# Altium PCB DB42.PcbDoc (part 2 of 8)
Units mil, origin at the board's own origin, x right, y up, seen from the top; angles counter-clockwise.
Board outline 3236.22 x 4456.69 mil, 8 copper layers (Top Layer, MidLayer1, MidLayer2, GND-Layer5, MidLayer3, VCC, MidLayer4, Bottom Layer), stack 62.194 mil thick; 214 components, 470 nets, 1802 pads, 1663 vias.
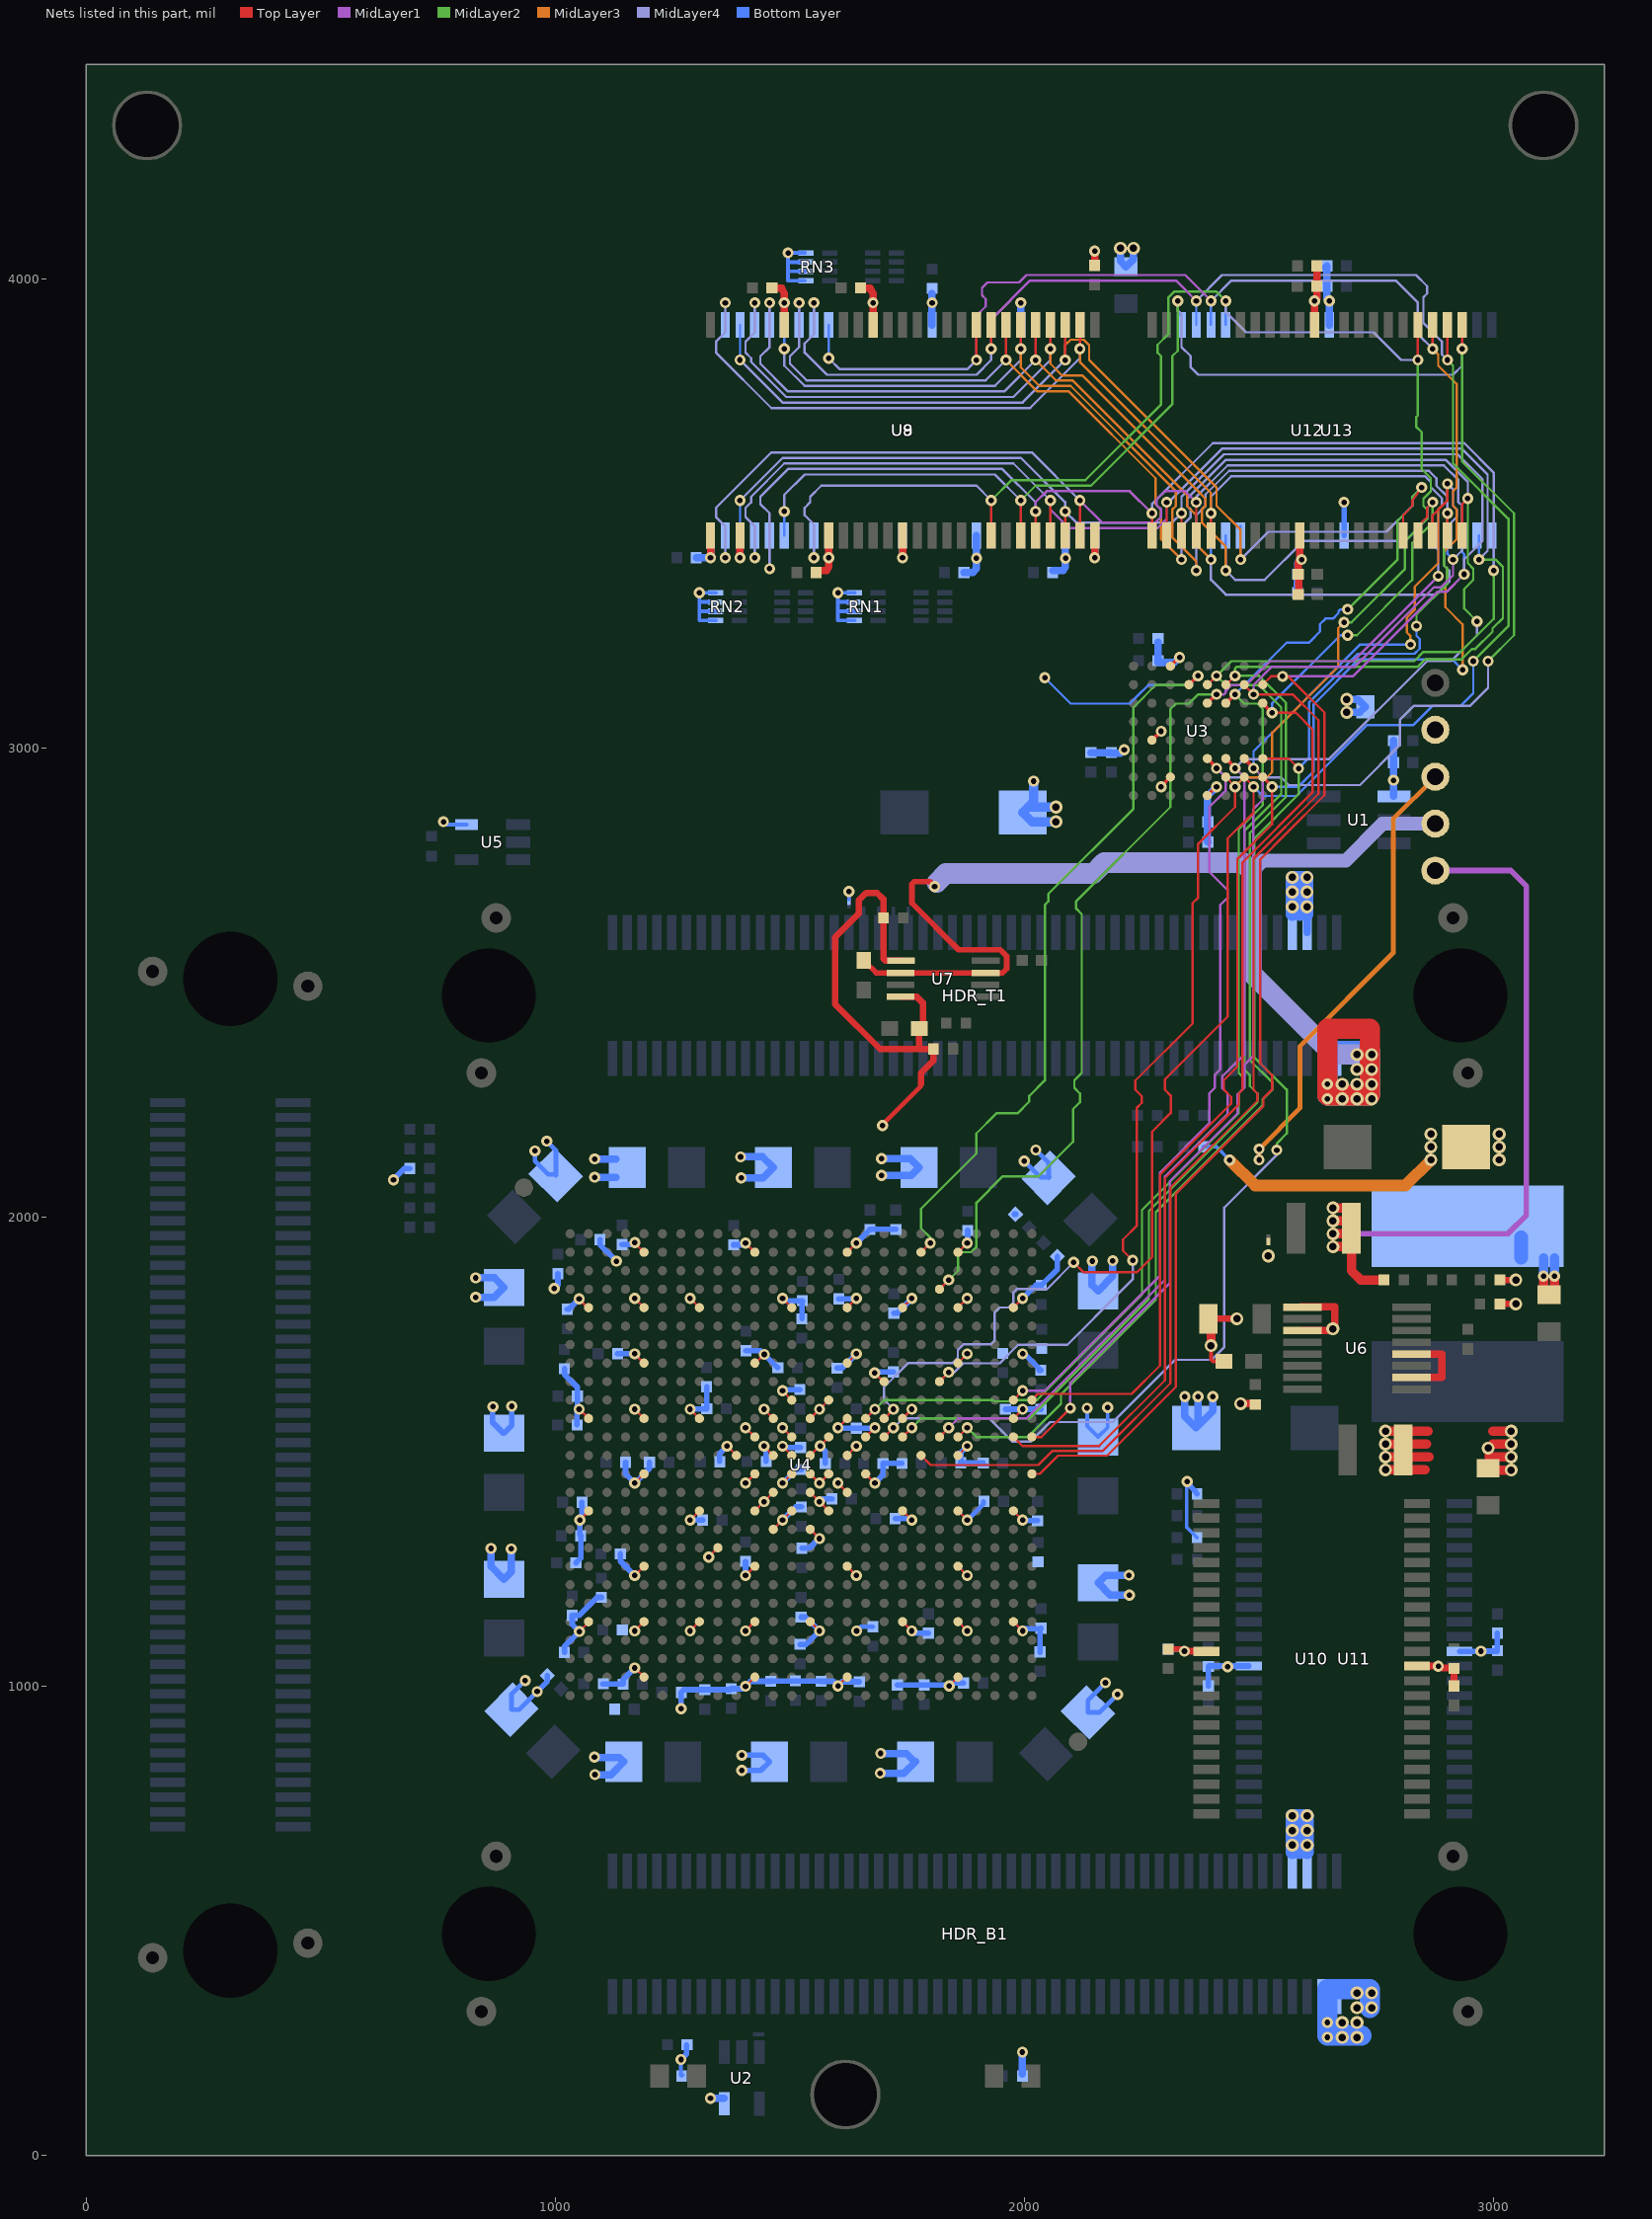
[diagram p8: the nets of this part, all layers, seen from the top]

## Part data
"Altium Logo Bot1" "Altium Logo Top1": library part D-000-0003, "Altium Logo for PCB"
C1 C11 C12 C13 C14 C23 C24 C25 C26 C27 C43 C44 C45 C46 C47 C48 C49 C50 C51 C52 C53 C54 C55 C56 C57 C58 C59 C60 C61 C62 C63 C64 C65 C66 C67 C68 C69 C101 C102 C103 C107 C121 C122 C123 C124 C129 C130 C133 C134 C137 C138 C139 C140: library part D-101-0080, "Capacitor, Ceramic, 0.1uF 10% 16V 0402 (1005) X7R"
C2 C15 C16 C17 C18 C28 C29 C30 C31 C32 C33 C34 C35 C36 C37 C38 C70 C71 C72 C73 C74 C75 C76 C77 C78 C79 C80 C81 C82 C83 C84 C85 C86 C87 C88 C89 C90 C91 C92 C93 C94 C95 C96 C97 C98 C104 C105 C106 C125 C126 C127 C128 C131 C132 C135 C136 C141 C142 C143 C144: library part D-101-0077, "Capacitor, Ceramic, 10nF 10% 16V 0402 (1005) X7R"
C3 C4 C5 C6 C7 C8 C9 C10 C19 C20 C21 C22 C39 C40 C41 C42: library part D-101-0007, "Capacitor, Tantalum, 10uF 10% 20V MCCT-B (3528)"
C99 C100 C112: library part D-101-0088, "Capacitor, Tantalum, 220uF 10% 10V MCCT-D (7343-31)"
C108 C109 C113 C115: library part D-101-0087, "Capacitor, Ceramic, 10uF 10% 10V 0805 (2012) X5R"
C110: library part D-101-0069, "Capacitor, Ceramic, 470pF 5% 50V 0402 (1005) COG"
C111 C118 C119: library part D-101-0095, "Capacitor, Ceramic, 2.2uF 10% 10V 0603 (1608) X5R"
C114 C116: library part D-101-0021, "Capacitor, Ceramic, 22uF -20%/+80% 10V 1210 (3225) Y5V"
C117: library part D-101-0027, "Capacitor, Ceramic, 1uF 10% 25V 1206 (3216) X7R"
C120: library part D-101-0105, "Capacitor, Ceramic, 0.033uF 10% 10V 0402 (1005) X7R"
HDR_B1 HDR_L1 HDR_T1: library part D-300-0025, "Connector, Molex Docking Station 100 Pin Male 54075"
L1: library part D-102-0004, "Inductor, 2.2uH, 15A, 4R2, SMD"
LED1: library part D-153-0004, "LED, Green 0805 (2012) KP-2012SGD"
LED2: library part D-153-0003, "LED, Red 0805 (2013) HSMH-C170"
MH1 MH2 MH3: library part D-001-0001, "Mounting Hole, M3 Screw, Plated, Square Pad"
NT1 NT2 NT3 NT4 NT5 NT6 NT7 NT8: library part D-002-0002, "Net-Tie, Surface Mount, 2 x 0.4mm x 0.2mm SMT Pads - For 0.2mm Track"
PCB1: library part D-810-0025, "DB42 Blank PCB - Daughter Board"
R1 R2 R9: library part D-100-0111, "Resistor, 270R 1% 0402 (1005)"
R3 R4 R5 R6 R7 R8 R14 R15 R16 R17: library part D-100-0131, "Resistor, 100R 1% 0402 (1005)"
R10 R11 R12 R13: library part D-100-0088, "Resistor, 4K7 1% 0402 (1005)"
R18 R23 R24 R25: library part D-100-0132, "Resistor, 100K 1% 0402 (1005)"
R19: library part D-100-0128, "Resistor, 10R 1% 0402 (1005)"
R20 R22: library part D-100-0105, "Resistor, 2K7 1% 0402 (1005)"
R21: library part D-100-0109, "Resistor, 27K 1% 0402 (1005)"
RN1 RN2 RN3 RN4 RN5 RN6: library part D-104-0001, "Resistor Network, Isolated, 4 x 100R, 5%, SMD 0402 x 4"
TP1 TP2 TP3 TP4 TP5: library part D-006-0000, "Test Point, PCB Mount with Silkscreen Box"
U1: library part D-263-0002, "Dual Addressable Switch Plus 1KB Memory"
U2 U5: library part D-205-0001, "SN74LVC1G04DBV, Single Inverter Gate, 1.65-V to 5.5-V"
U3: library part D-262-0001, "S29GL256N11FFIV10, 256 Megabit (16M x 16) 3.0V Page Mode Flash Memory"
U4: library part D-241-0013, "FPGA, Xilinx Spartan 3A-DSP-1800 FG676"
U6: library part D-204-0002, "MAX1831EEE, 3A, 1MHz, Low-Voltage, Step-Down Regulators with Synchronous Rectification and Internal Switches"
U7: library part D-204-0016, "MAX8860EUA18+, 1.8V Linear Regulator with adjustable Output, Low-noise, Low-dropout, 300mA, uMAX"
U8 U9: library part D-261-0000, "MT48LC16M16A2TG, 256 Mbit High-Speed CMOS SDRAM, 16Mb x 16Bit x 4 Banks, TSOP54"
U10 U11 U12 U13: library part D-260-0000, "K6R4016V1D-TC10T, 256K x 16-Bit SRAM, TSOP44"

## Via types
v1: diameter 23.62, hole 11.81, Top Layer to Bottom Layer, 1081 vias
v2: diameter 23.62, hole 11.81, Top Layer to Bottom Layer, tented both sides, 466 vias
v3: diameter 27.56, hole 15.75, Top Layer to Bottom Layer, 116 vias

## Nets (pads, with @x,y where several pads share a name; then routed paths per layer and width w, separated by ;. In a path a pad name is that pad's centre, name@x,y a point inside that pad or via, vN(x,y) a via of type N, cw(c..) or ccw(c..) an arc to the next point about the centre after c; other vN are vias at no path point)
1V2: C3.1 C4.1 C5.1 C6.1 C7.1 C8.1 C9.1 C10.1 C11.1 C12.1 C13.1 C14.1 C15.1 C16.1 C17.1 C18.1 C112.1 C115.1 C116.1 L1.2 R20.1 TP5.1 U4.K15 U4.L12 U4.L14 U4.L16 U4.M11 U4.M13 U4.M15 U4.M17 U4.N12 U4.N13 U4.N14 U4.N16 U4.P11 U4.P13 U4.P14 U4.P15 U4.R12 U4.R14 U4.R16 U4.T11 U4.T13 U4.T15 U4.U12 | length 4291.5
  Top Layer w5: v1(1405.51,1433.07) U4.P11@1425.2,1452.76 ; v1(1405.51,1551.18) U4.M11@1425.2,1531.5 ; U4.T11@1425.2,1374.02 v1(1444.88,1393.7) U4.R12@1464.57,1413.39 ; v1(1444.88,1511.81) U4.N12@1464.57,1492.13 ; v1(1444.88,1590.55) U4.L12@1463.37,1572.06 ; U4.U12@1464.57,1334.65 v1(1484.25,1354.33) U4.T13@1503.94,1374.02 ; U4.L12@1464.57,1570.87 U4.L12@1463.37,1572.06 ; U4.L12@1465.29,1572.06 1464.57,1572.06 U4.L12@1463.37,1572.06 ; v1(1484.25,1433.07) U4.P13@1503.94,1452.76 ; v1(1484.25,1511.81) U4.N13@1503.94,1492.13 ; v1(1484.25,1551.18) U4.M13@1503.94,1531.5 ; U4.L14@1542.52,1570.47 1542.91,1570.47 U4.L14@1543.31,1570.87 v1(1562.99,1590.55) ; U4.R14@1543.31,1413.39 v1(1562.99,1393.7) U4.T15@1582.68,1374.02 ; U4.P14@1543.31,1452.76 v1(1562.99,1433.07) U4.P15@1582.68,1452.76 ; U4.N14@1543.31,1492.13 v1@1562.99,1511.81 ; v1@1562.99,1590.95 v1(1562.99,1590.55) ; v1@1564,1589.55 v1@1564.57,1590.12 ; v1(1564.57,1512.21) 1582.68,1530.31 U4.M15@1582.68,1531.5 U4.M15@1583.46,1531.5 ; U4.K15@1582.68,1610.24 v1(1562.99,1590.55) ; v1(1602.36,1433.07) U4.R16@1622.05,1413.39 ; v1(1602.36,1551.18) U4.L16@1622.05,1570.87 ; v1@1602.76,1550.79 v1@1603.54,1551.57 ; U4.N16@1622.05,1492.13 v1(1641.73,1511.81) ; U4.M17@1661.42,1531.5 v1(1681.1,1551.18)
  Top Layer w19.68: C116.1@2694.88,1974.4 2692.91,1976.37 2694.88,1978.34 C116.1@2704.72,1988.19 ; C116.1@2696.85,1976.37 2696.85,1948.82 2696.85,1885.83 2716.54,1866.14 R20.1@2766.22,1866.14 ; C115.1@3106.3,1834.64 v1(3106.3,1874.02) ; C115.1@3129.92,1834.64 v1(3129.92,1874.02)
  Top Layer w20: v3(2657.47,1937) C116.1@2696.85,1937 ; v3(2657.47,1964.56) C116.1@2696.85,1964.56 ; v3(2657.47,1992.12) C116.1@2696.85,1992.12 ; v3(2657.47,2019.68) C116.1@2696.85,2019.68
  MidLayer1 w12: v3(2657.47,1964.56) 3030.56,1964.56 3070,2004 3070,2705 3036.33,2738.67 TP5.1@2875.71,2738.67
  Bottom Layer w11.81: C14.1@1095.2,1952.26 1095.2,1941.36 v1(1130.39,1906.17) ; v1@1444.88,1512.99 1445.47,1512.4 1448.82,1509.06 C17.1@1448.82,1479.92 ; v1(1484.25,1354.33) 1512.45,1382.53 C16.1@1524.22,1382.53 ; v1(1484.25,1433.07) 1513.41,1462.23 C13.1@1524.22,1462.23 ; v1(1562.99,1393.7) 1568.9,1399.61 C12.1@1589.57,1399.61 ; v1(1564.57,1512.21) 1575.38,1501.4 C11.1@1575.38,1475.02 ; v1@1603.15,1551.97 1604.92,1550.2 C18.1@1641.73,1550.2 1680.12,1550.2 v1(1681.1,1551.18)
  Bottom Layer w12: v1(1484.25,1511.81) 1487.2,1508.86 C15.1@1522.64,1508.86
  Bottom Layer w15.75: v2(830.5,1829.26) 869.34,1829.26 C10.1@890.44,1850.36 870.22,1870.58 v2(830.5,1870.58) ; v1(862.97,1293.96) 862.97,1255.91 C8.1@890.44,1228.43 906.26,1244.26 v1(906.26,1292.98) ; v1@1082.4,848.21 1083.38,848.21 1136.82,848.21 C9.1@1145.76,839.26 1118.3,811.8 v1(1084.37,811.8) ; v2(1083.89,2123.88) C6.1@1128.89,2123.88 ; v2(1083.94,2084.97) C6.1@1128.94,2084.97 ; v1(1693.46,857.06) 1747.79,857.06 C7.1@1766.64,838.21 ; v1@1694.36,814.34 1742.76,814.34 C7.1@1767.69,839.26 ; v2(1695.43,2089.03) 1758.89,2089.03 C5.1@1775.57,2105.71 1756.82,2124.46 v2(1695.43,2124.46) ; v1@2144.14,1906.99 2144.14,1906.3 2144.14,1855.25 C3.1@2156.88,1842.5 2188.19,1873.81 v1(2188.19,1907.09) ; v1(2222.86,1236.89) 2173.23,1236.89 C4.1@2156.9,1220.56 2182.88,1194.58 v1(2223.84,1194.58) v1@2224.82,1194.58 ; v1(2341.79,1617.56) 2341.79,1575.19 C112.1@2366.07,1550.91 C112.1@2370.08,1554.92 ; v1(2370.08,1617.56) C112.1@2370.08,1554.92 ; v1(2401.58,1617.56) 2401.58,1586.42 C112.1@2370.08,1554.92
  Bottom Layer w19.68: v1(3106.3,1874.02) L1.2@3106.3,1913.39 ; v1(3129.92,1874.02) L1.2@3129.92,1913.39
  Bottom Layer w29.53: L1.2@3059.06,1913.38 L1.2@3059.06,1956.69
  other v1: 1692.48,814.75 1083.38,849.19 2144.88,1906.3
2V5: C19.1 C20.1 C21.1 C22.1 C23.1 C24.1 C25.1 C26.1 C27.1 C28.1 C29.1 C30.1 C31.1 C32.1 C33.1 C34.1 C35.1 C36.1 C37.1 C38.1 C118.1 R18.2 R24.1 TP3.1 U4.AB5 U4.AB11 U4.AB22 U4.E5 U4.E16 U4.E22 U4.J18 U4.K13 U4.L5 U4.N10 U4.P17 U4.T22 U4.U14 U4.V9 U7.1 U7.4 | length 3482.1
  Top Layer w5: v1(1169.29,1118.11) U4.AB5@1188.98,1137.8 ; v1(1169.29,1590.55) U4.L5@1188.98,1570.87 ; v1(1169.29,1826.77) U4.E5@1188.98,1807.09 ; v1(1326.77,1275.59) U4.V9@1346.46,1295.28 ; v1(1366.14,1511.81) U4.N10@1385.83,1492.13 ; v1(1405.51,1118.11) U4.AB11@1425.2,1137.8 ; v1(1484.25,1629.92) U4.K13@1503.94,1610.24 ; U4.U14@1543.31,1334.65 v1(1562.99,1314.96) ; U4.E16@1622.05,1807.09 v1(1641.73,1826.77) ; U4.P17@1661.42,1452.76 v1(1681.1,1433.07) ; v1(1680.71,1668.11) 1699.21,1649.61 U4.J18@1700.79,1649.61 ; 1779.53,2279.53 1779.53,2283.46 ; U4.AB22@1858.27,1137.8 v1(1877.95,1118.11) ; U4.T22@1858.27,1374.02 v1(1877.95,1354.33) ; U4.E22@1858.27,1807.09 v1(1877.95,1826.77)
  Top Layer w10: v1(1697.4,2195.3) 1697.4,2197.27 1771.2,2271.07 ; 1759.84,2259.84 1779.53,2279.53
  Top Layer w13.78: U7.4@1736.22,2469.48 1770.67,2469.48 1783.46,2456.69 1783.46,2413.39 C118.1@1775.59,2405.51 ; U7.1@1737.2,2546.26 1703.75,2546.25 1699.29,2550.71 R24.1@1699.29,2637.79 1699.29,2677.68 1686.02,2690.94 1662.4,2690.94 1646.65,2675.2 1646.65,2646.65 1596.46,2596.46 1596.46,2453.74 1691.93,2358.26 R18.2@1805.59,2358.26 ; 1775.59,2358.27 C118.1@1775.59,2401.57 ; 1779.53,2283.46 1779.53,2307.09 1795.28,2322.83 1805.59,2333.15 R18.2@1805.59,2354.33
  MidLayer3 w10: v1(2500,2122.05) v1(2500,2145) 2587,2232 2587,2364 2786,2563 2786,2848.96 TP3.1@2875.71,2938.67
  Bottom Layer w10: v1(935.78,1012.54) 906.46,983.21 C20.1@906.46,950.02 922.47,950.02 v1(961.37,988.92) ; v1(956.45,2141.18) 956.45,2119.54 984.98,2091 C22.1@1001.11,2091 ; v1(982.03,2161.85) 1001.11,2142.77 C22.1@1001.11,2091 ; C22.1@1001.11,2089.53 C22.1@1001.11,2091 ; v1(1642.06,1117.99) 1651.04,1126.97 C33.1@1677.17,1126.97 ; v1(1877.95,1354.33) 1912.87,1389.25 C28.1@1912.87,1393.97 ; v1(1999.49,2119.54) 2033.93,2085.1 C21.1@2051.71,2085.1 ; v1(2024.09,2143.15) 2051.71,2115.53 C21.1@2051.71,2085.1 ; C21.1@2051.71,2083.96 C21.1@2051.71,2085.1 ; C21.1@2052.62,2085.1 C21.1@2051.71,2085.1 ; v1(2172.67,1007.62) 2135.22,970.17 C19.1@2135.22,944.46 2159.7,944.46 v1(2198.26,983.02)
  Bottom Layer w11.81: v1(961.37,988.92) 983.16,1010.71 C35.1@983.16,1023.22 ; v1(1484.25,1629.92) 1486.79,1632.46 C37.1@1521.26,1632.46 ; v1(1681.1,1433.07) 1698.39,1450.36 C29.1@1698.39,1475.02 C23.1@1738.72,1475.02 ; C31.1@1978.67,2006.23 C31.1@1980.94,2006.23
  Bottom Layer w12: C30.1@1350,1479.53 1350,1495.67 v1(1366.14,1511.81) ; C27.1@1525.59,1294.29 1541.54,1294.29 v1@1561.81,1314.57 ; C26.1@1604.33,1825.79 1640.75,1825.79 v1(1641.73,1826.77) ; v1(1680.71,1668.11) 1682.87,1670.28 C24.1@1720.47,1670.28
3V3: C1.2 C2.1 C39.1 C40.1 C41.1 C42.1 C43.1 C44.1 C45.1 C46.1 C47.1 C48.1 C49.1 C50.1 C51.1 C52.1 C53.1 C54.1 C55.1 C56.1 C57.1 C58.1 C59.1 C60.1 C61.1 C62.1 C63.1 C64.1 C65.1 C66.1 C67.1 C68.1 C69.1 C70.1 C71.1 C72.1 C73.1 C74.1 C75.1 C76.1 C77.1 C78.1 C79.1 C80.1 C81.1 C82.1 C83.1 C84.1 C85.1 C86.1 C87.1 C88.1 C89.1 C90.1 C91.1 C92.1 C93.1 C94.1 C95.1 C96.1 C97.1 C98.1 C99.1 C100.1 C101.2 C102.1 C103.1 C104.1 C105.1 C106.1 C107.1 C108.1 C109.1 C121.1 C122.1 C123.1 C124.1 C125.1 C126.1 C127.1 C128.1 C129.1 C130.1 C131.1 C132.1 C133.1 C134.1 C135.1 C136.1 C137.1 C138.1 C139.1 C140.1 C141.1 C142.1 C143.1 C144.1 HDR_B1.94 HDR_B1.96 HDR_T1.94 HDR_T1.96 NT1.2 R1.1 R2.1 R10.2 R11.2 R12.2 R13.2 RN1.1 RN1.2 RN1.3 RN1.4 RN2.1 RN2.2 RN2.3 RN2.4 RN3.1 RN3.2 RN3.3 RN3.4 TP2.1 U1.4 U2.5 U3.D8 U3.F1 U3.F7 U3.G5 U4.AB2 U4.AB8 U4.AB14 U4.AB19 U4.AB25 U4.AE5 U4.AE11 U4.AE16 U4.AE22 U4.B5 U4.B11 U4.B16 U4.B22 U4.E2 U4.E8 U4.E13 U4.E19 U4.E25 U4.H5 U4.H11 U4.H16 U4.H22 U4.L2 U4.L8 U4.L19 U4.L25 U4.N22 U4.P5 U4.T2 U4.T8 U4.T19 U4.T25 U4.W5 U4.W11 U4.W16 U4.W22 U5.5 U8.1 U8.3 U8.9 U8.14 U8.27 U8.43 U8.49 U9.1 U9.3 U9.9 U9.14 U9.27 U9.43 U9.49 U10.11 U10.33 U11.11 U11.33 U12.11 U12.33 U13.11 U13.33 | length 9406.7
  Top Layer w5: v1@1046.97,1591.42 v1(1050.79,1590.55) 1070.87,1571.42 U4.L2@1070.87,1570.87 ; v1(1050.8,1825.8) 1050.08,1825.98 1050.53,1825.53 1069.92,1806.14 1070.04,1806.02 U4.E2@1070.31,1806.02 ; v1(1051.38,1116.81) 1051.38,1117.09 1070.87,1136.57 U4.AB2@1070.87,1137.8 ; v2(1052.37,1354.18) U4.T2@1070.83,1372.64 ; U4.T2@1068.46,1373.94 U4.T2@1070.04,1373.94 ; U4.T2@1069.25,1372.64 U4.T2@1070.83,1372.64 ; U4.T2@1070.87,1372.67 U4.T2@1070.87,1374.02 ; U4.T2@1071.57,1372.64 U4.T2@1070.87,1372.64 ; v1(1169.29,1236.22) U4.W5@1188.98,1255.91 ; v1(1169.29,1433.07) U4.P5@1188.98,1452.76 ; v1@1169.29,1944.88 U4.B5@1188.98,1925.2 ; v1@1169.68,1707.87 1187.8,1689.76 1188.98,1689.76 U4.H5@1190.16,1689.76 ; v1@1169.98,1039.1 1188.98,1020.1 U4.AE5@1188.98,1019.68 ; v1(1287.4,1118.11) U4.AB8@1307.09,1137.8 ; v1(1287.4,1354.33) U4.T8@1307.09,1374.02 ; v1(1287.4,1590.55) U4.L8@1307.09,1570.87 ; v1(1287.4,1826.77) U4.E8@1307.09,1807.09 ; v1(1405.51,1000) U4.AE11@1425.2,1019.68 ; v1(1405.51,1236.22) U4.W11@1425.2,1255.91 ; v1(1405.51,1944.88) U4.B11@1425.2,1925.2 ; U4.H11@1425.2,1688.98 1426.77,1688.98 v1(1445.28,1707.48) ; v1(1484.25,1826.77) U4.E13@1503.94,1807.09 ; U4.AB14@1543.31,1137.8 v1(1562.99,1118.11) ; U8.9@1582.68,3433.07 U8.9@1582.68,3452.76 ; v1(1602.4,1000.98) 1621.1,1019.68 U4.AE16@1622.05,1019.68 ; U4.W16@1622.05,1255.91 v1(1641.73,1236.22) ; U4.H16@1622.05,1688.98 v1(1641.73,1708.66) ; U4.B16@1622.05,1925.2 v1(1641.73,1944.88) ; U4.AB19@1740.16,1137.8 v1(1759.84,1118.11) ; U4.T19@1740.16,1374.02 v1(1759.84,1354.33) ; U4.L19@1740.16,1570.87 v1(1759.84,1590.55) ; U4.E19@1740.16,1807.09 v1(1759.84,1826.77) ; v1(1839.33,1000.71) U4.AE22@1858.27,1019.65 ; U4.W22@1858.27,1255.91 v1(1877.95,1236.22) ; U4.N22@1858.27,1492.13 v1(1877.95,1511.81) ; U4.H22@1858.27,1688.98 v1(1877.95,1708.66) ; U4.B22@1858.27,1925.2 v1(1877.95,1944.88) ; U4.AB25@1976.38,1137.8 v1(1996.06,1118.11) ; U4.T25@1976.38,1374.02 v1(1996.06,1354.33) ; U4.L25@1976.38,1570.87 v1(1996.06,1590.55) ; U4.E25@1976.38,1807.09 v1(1996.06,1826.77)
  Top Layer w7.87: U3.G5@2271.65,3016.73 v1(2291.34,3035.43) ; v1@2291.34,2918.31 U3.F7@2311.02,2937.99 ; U3.F1@2311.02,3174.21 2330.22,3193.41 v1@2330.71,3193.9 ; U3.D8@2389.76,2898.62 2408.96,2917.82 v1@2409.45,2918.31
  Top Layer w12: C130.1@2306.5,1079.45 2336.55,1079.45 v1(2341,1075)
  Top Layer w15: v1@2343,1075 2343.2,1074.8 U10.33@2387.89,1074.8 ; U10.11@2836.71,1043.3 v1@2881.7,1043.3 ; v1(2882,1043) v1@2881.7,1043.3 ; C131.1@2915.44,1000.98 C129.1@2915.44,1038.37 2914.45,1039.37 2889.76,1039.37 2885.83,1043.3 2882,1043.3 v1@2881.7,1043.3
  Top Layer w15.75: v2@1330.71,3409.45 U8.1@1330.71,3452.76 ; v2(1393.7,3405.51) U8.3@1393.7,3452.76 ; C125.1@1461.61,3980.31 1482.28,3980.32 1488.19,3968.51 ; U8.49@1488.19,3901.57 v2(1488.19,3948.82) ; v2@1488.19,3944.88 v2(1488.19,3948.82) ; 1488.19,3964.57 v2(1488.19,3948.82) ; C122.1@1556.1,3377.95 1578.74,3377.95 1582.68,3385.83 1582.68,3389.76 1583.46,3401.52 1583.58,3403.35 v2@1583.66,3404.53 ; U8.9@1582.68,3452.76 v2@1582.68,3409.45 ; C126.1@1650.59,3980.31 1671.26,3980.32 1677.17,3968.51 v2(1677.17,3948.82) ; U8.43@1677.17,3901.57 v2(1677.17,3948.82) ; v2@1677.17,3944.88 v2(1677.17,3948.82) ; v2(1740.16,3405.51) U8.14@1740.16,3452.76 ; v2(2149.6,3405.52) U8.27@2149.61,3452.76 ; C121.1@2149.6,4028.54 v2(2149.61,4059.06) ; C141.1@2582.4,3371.05 C141.1@2583.38,3370.07 2583.38,3394.4 v2(2590.55,3401.57) 2586.61,3405.51 U12.11@2586.61,3452.76 ; C137.1@2584.37,3329.71 2584.37,3370.07 C141.1@2584.34,3370.23 ; U12.33@2618.11,3901.57 v2(2618.11,3952.76) 2623.03,3957.67 2623.03,3984.24 C138.1@2623.03,4027.55 ; v2@1582.68,3409.45 v2@1583.43,3405.66 ; v2@1582.68,3409.45 v2@1583.43,3405.66 ; v2@1583.43,3405.66 v2@1583.66,3404.53 ; v2@1583.43,3405.66 v2@1583.66,3404.53
  MidLayer3 w25: v1(2437.37,2121.5) 2491.49,2067.38 2812.27,2067.38 2866.14,2121.25 v3(2866.14,2122.05)
  Bottom Layer w5: v1@1046.26,1586.81 v1(1050.79,1590.55) ; v1@1049.41,1117.13 1050.55,1115.98 v1@1050.79,1115.75 ; v1(1268.07,952.24) v1@1268.31,952.48
  Bottom Layer w7.87: v1(1267.72,204.72) 1267.72,170.78 R1.1@1269.21,169.29 R1.1@1271.65,171.73 ; C101.2@1279.53,235.24 C101.2@1280.51,236.22 ; RN2.1@1342.51,3271.65 RN2.1@1341.54,3271.65 1307.09,3271.65 1307.09,3291.34 ; RN2.2@1342.51,3291.34 RN2.2@1341.54,3291.34 1307.09,3291.34 ; RN2.3@1342.51,3311.02 RN2.3@1341.54,3311.02 1307.09,3311.02 ; RN2.4@1342.51,3330.71 RN2.4@1341.54,3330.71 v1(1307.09,3330.71) 1307.09,3311.02 ; U2.5@1359.25,122.05 U2.5@1360.23,123.03 ; RN3.1@1531.49,3996.06 1496.07,3996.06 1496.07,4015.74 ; RN3.2@1531.49,4015.74 1496.07,4015.74 ; RN3.3@1531.49,4035.43 1496.07,4035.43 ; RN3.4@1531.49,4055.11 v1(1496.07,4055.11) 1496.07,4035.43 ; NT1.2@1625.98,2677.17 v2@1625.98,2688.98 ; RN1.1@1637.79,3271.65 1602.36,3271.65 1602.36,3291.34 ; RN1.2@1637.79,3291.34 1602.36,3291.34 ; RN1.3@1637.79,3311.02 1602.36,3311.02 ; RN1.4@1637.79,3330.71 v1(1602.36,3330.71) 1602.36,3311.02 ; 1307.09,3291.34 1307.09,3311.02 ; 1496.07,4015.74 1496.07,4035.43 ; 1602.36,3291.34 1602.36,3311.02
  Bottom Layer w8: v1(761.62,2842.78) 767.51,2836.88 U5.5@810.8,2836.88 ; v1(2133.46,1592.91) 2133.46,1554.98 C40.1@2156.9,1531.55 2177.17,1551.81 v1(2177.17,1594.49) ; 2345.8,1393.34 2345.8,1435.6 v1(2346.84,1436.64) ; 2345.8,1416.96 2345.8,1434.62 v1@2345.86,1434.67 ; v1@2346.5,1435.8 v1@2347.27,1434.87 ; v1@2347.35,1434.95 v1@2347.27,1434.87 ; R13.2@2366.65,1411.41 R13.2@2366.65,1416.83 ; R12.2@2367.64,1317.04 2345.8,1338.88 2345.8,1433.4 v1@2347.27,1434.87 ; R11.2@2381.92,2150.17 2408.71,2150.17 v1(2437.37,2121.5)
  Bottom Layer w11: v1@2347.27,1434.87 R13.2@2367.64,1410.21
  Bottom Layer w11.81: v1@655.51,2080.71 678.53,2103.73 R10.2@689.74,2103.73 ; C62.1@1046.26,1557.09 v1@1046.26,1586.81 ; v1@1046.26,1595.08 1046.98,1594.36 v1(1050.79,1590.55) ; C44.1@1149.61,1477.36 1149.61,1452.75 v1(1169.29,1433.07) 1200.79,1464.57 C46.1@1200.79,1477.36 ; v1(1267.72,204.72) 1279.53,216.54 C101.2@1279.53,235.24 ; v1@1268.31,952.48 C66.1@1268.31,987.2 ; v1(1287.4,1354.33) C71.1@1313.98,1354.33 ; v1(1287.4,1590.55) 1288.38,1591.54 C77.1@1322.83,1591.54 ; C97.1@1379.92,1940.94 1401.57,1940.95 v1(1405.51,1944.88) ; v1(1405.51,1236.22) C49.1@1405.51,1266.34 ; C78.1@1406.5,1715.55 1437.2,1715.55 v1(1445.28,1707.48) 1473.62,1679.13 C45.1@1474.41,1679.13 ; v1(1484.25,1826.77) 1489.17,1821.85 C79.1@1526.57,1821.85 ; C52.1@1521.65,1089.57 1534.45,1089.57 v1(1562.99,1118.11) 1533.46,1147.64 C53.1@1523.62,1147.64 ; C51.1@1525.59,1783.46 1525.59,1819.29 C79.1@1526.38,1820.08 ; v1@1598.66,997.24 v1(1602.4,1000.98) ; C70.1@1600.39,1678.15 1611.22,1678.15 v1(1641.73,1708.66) ; C56.1@1721.46,1795.28 1728.35,1795.28 v1(1759.84,1826.77) ; C76.1@1724.41,1357.28 1756.89,1357.28 v1(1759.84,1354.33) ; v1(1759.84,1118.11) 1764.76,1113.19 C54.1@1795.28,1113.19 ; C86.1@1786.42,1002.95 1837.09,1002.95 v1(1839.33,1000.71) 1845.51,1006.89 C55.1@1870.08,1006.89 ; C50.1@1864.17,1476.38 1864.17,1498.03 v1(1877.95,1511.81) v1@1881.89,1515.75 ; v1(1877.95,1944.88) 1878.94,1945.87 C64.1@1878.94,1971.46 ; C75.1@1959.65,1590.55 v1(1996.06,1590.55) ; v1(1996.06,1118.11) 2000.99,1123.03 C89.1@2034.45,1123.03 ; v1(1996.06,1826.77) v1@1997.05,1827.76 ; v1@1997.24,1590.55 C67.1@2035.43,1590.55 ; C93.1@2032.94,1072.56 C93.1@2032.94,1073.55 2032.94,1121.53 C89.1@2034.45,1123.03 ; C89.1@2035.43,1123.03 C89.1@2034.45,1123.03 ; C89.1@2035.43,1124.02 C89.1@2034.45,1123.03 ; C133.1@2391.82,1000.98 C135.1@2391.82,1042.31 2392.81,1043.3 2433,1043.3 v1@2434.3,1043.3 ; v1(2433,1042) v1@2434.3,1043.3 ; U11.11@2478.44,1043.3 v1@2434.3,1043.3 ; U13.11@2681.1,3452.76 v2(2681.1,3523.62) ; U11.33@2927.25,1074.79 2972.79,1074.79 v1(2973,1075) 3007.08,1075 C136.1@3007.87,1075.78 C134.1@3007.87,1113.18
  Bottom Layer w12: v1@865.92,1596.05 865.92,1562.59 889.09,1539.42 C42.1@890.44,1539.42 890.97,1539.42 907.25,1555.7 v1(907.25,1597.03) ; v1(997.48,1847.72) 1005.65,1855.88 C65.1@1005.65,1879.43 ; C83.1@1019.42,1072.56 1019.42,1084.85 1050.55,1115.98 v1(1051.38,1116.81) 1036.15,1132.04 C60.1@1036.15,1151.27 1050.91,1151.28 1089.28,1189.65 C73.1@1098.14,1189.65 ; C68.1@1019.42,1676.73 1019.42,1664.93 1046.98,1637.37 C72.1@1046.98,1618.68 1046.98,1594.36 v1(1050.79,1590.55) ; C85.1@1025.33,1803.68 1028.68,1803.68 v1(1050.8,1825.8) ; C98.1@1044.03,1263.46 1054.13,1273.56 C57.1@1054.13,1320.87 ; C57.1@1054.85,1320.15 C57.1@1054.13,1320.87 ; C69.1@1056.82,1392.36 1056.82,1358.63 v2(1052.37,1354.18) 1052.37,1322.63 C57.1@1054.13,1320.87 ; C92.1@1101.1,1004.66 1102.09,1004.66 C84.1@1144.39,1004.66 1144.39,1014.5 v1(1168.99,1039.1) ; C94.1@1132.59,1709.21 1168.57,1709.21 1169.2,1708.57 v1@1171.36,1706.41 ; C59.1@1138.49,1282.15 1138.49,1267.02 v1(1169.29,1236.22) ; C63.1@1142.42,1941.43 1164.85,1941.43 v1(1169.39,1945.97) ; C66.1@1268.31,987.2 1273.96,992.86 C91.1@1318.56,992.86 1372.68,992.86 C90.1@1374.65,994.83 1400.34,994.83 v1(1405.51,1000) 1416.09,1010.57 C47.1@1459.27,1010.57 1460.26,1011.56 C82.1@1511.42,1011.56 1565.54,1011.56 C61.1@1566.53,1010.57 1592.81,1010.57 v1(1602.4,1000.98) 1611.01,1009.59 C80.1@1648.2,1009.59 ; C77.1@1322.5,1593.1 C48.1@1322.5,1638.35 ; v1(1397.28,820.66) 1438.13,820.66 C39.1@1456.74,839.26 1442.88,853.13 v1(1397.28,853.13) ; v1(1641.73,1944.88) 1670.75,1973.9 C96.1@1670.83,1973.9 ; C96.1@1671.31,1973.43 C96.1@1670.83,1973.9 ; C81.1@1725.94,1973.9 C96.1@1670.83,1973.9 ; C95.1@1728.89,1002.7 1786.17,1002.7 C86.1@1786.42,1002.95 ; C50.1@1864.17,1476.38 1864.55,1476 C43.1@1911.91,1476 ; v1(1996.06,1354.33) 1997.4,1352.99 C88.1@2028.02,1352.99 ; v1(1996.06,1708.66) 2000.04,1708.66 C58.1@2034.91,1673.79 C58.1@2030.94,1673.79 ; v1(1996.06,1826.77) 2024.14,1854.85 C87.1@2035.9,1854.85 2070.19,1889.14 C74.1@2070.19,1915.99 ; C132.1@2306.5,1079.45 2336.55,1079.45 v1(2341,1075)
  Bottom Layer w15.75: C123.1@1300.19,3405.5 v2(1330.71,3405.51) ; U9.27@1329.73,3437.99 U9.27@1330.71,3437.01 ; v1(1330.71,122.05) U2.5@1359.25,122.05 ; v2@1330.71,3404.53 v2(1330.71,3405.51) ; U9.27@1330.71,3452.76 U9.27@1330.71,3437.01 ; v1@1394.91,2083.43 v1(1396.06,2083.46) 1442.32,2083.43 C41.1@1464.6,2105.71 1441.88,2128.43 v1(1394.91,2128.43) ; v2(1740.16,3405.51) U9.14@1740.16,3452.76 ; U9.43@1803.15,3901.57 v2(1803.15,3948.82) C124.1@1803.15,3968.5 ; C128.1@1871.06,3374.01 1889.76,3374.01 1897.64,3381.89 v2(1897.64,3404.53) 1897.64,3405.51 U9.9@1897.64,3452.76 ; U9.49@1992.13,3901.57 v2(1992.13,3948.82) ; R2.1@1995.59,173.23 v1(1995.59,220.47) ; C127.1@2060.05,3377.95 2082.68,3377.95 2086.62,3385.83 2086.62,3389.76 2086.62,3404.53 v2@2086.62,3409.45 ; U9.3@2086.61,3452.76 v2@2086.62,3409.45 ; v2(2087.6,3404.53) v2@2086.62,3409.45 ; C107.1@2141.73,2990.16 C104.1@2185.04,2990.16 2186.02,2989.18 2204.73,2989.18 v1(2212.6,2996.06) ; v2(2149.6,3405.52) 2149.61,3409.45 U9.1@2149.61,3452.76 ; v3(2204.72,4064.96) 2204.72,4037.4 C109.1@2216.53,4025.58 2232.28,4041.34 v3(2232.28,4064.96) ; C103.1@2284.45,3225.39 2284.45,3186.02 2284.45,3182.09 2318.9,3182.09 v1@2330.22,3193.41 ; C102.1@2390.74,2799.21 2389.76,2800.19 2389.76,2842.52 2389.76,2897.64 v1@2409.45,2917.33 ; C139.1@2581.69,3330.7 C143.1@2581.69,3370.07 2582.68,3371.06 2582.68,3393.7 v2(2590.55,3401.57) ; HDR_T1.96@2602.36,2606.3 2602.36,2645.67 ; C140.1@2641.73,4024.61 C140.1@2644.68,4027.56 C144.1@2644.68,3984.24 2644.68,3957.68 v2(2649.61,3952.76) v2@2649.61,3956.7 ; U13.33@2649.88,3901.57 v2@2649.88,3944.88 ; v3(2687.01,3075.79) 2714.58,3075.79 C108.1@2726.39,3087.59 2710.63,3103.35 v3(2687.01,3103.35) ; U1.4@2786.42,2897.63 v2(2786.42,2931.1) C2.1@2786.41,2968.5 C1.2@2786.41,3015.74 ; v2(1330.71,3405.51) U9.27@1330.71,3437.01
  Bottom Layer w19.68: v1(2019.68,2929.13) 2019.68,2886.02 C100.1@2007.68,2874.02 ; v3(2066.93,2842.52) 2016.09,2842.52 C100.1@1996.14,2862.48 C100.1@2007.68,2874.02 ; v3(2066.93,2874.02) C100.1@2007.68,2874.02
  Bottom Layer w27.56: 2570.87,645.67 v3(2570.87,661.42) v3(2570.87,692.91) v3(2570.87,724.41) 2586.62,724.41 ; 2570.87,2645.67 v3(2570.87,2661.42) v3(2570.87,2692.91) v3(2570.87,2724.41) 2586.61,2724.41 ; 2586.62,645.67 2586.62,661.42 2586.62,692.91 2586.62,724.41 ; 2586.61,2645.67 2586.61,2661.42 2586.61,2692.91 2586.61,2724.41 ; 2602.36,645.67 v3(2602.37,661.42) v3(2602.37,692.91) v3(2602.37,724.41) 2586.62,724.41 ; 2602.36,2645.67 v3(2602.36,2661.42) v3(2602.36,2692.91) v3(2602.36,2724.41) 2586.61,2724.41
  other v1: 866.9,1596.05 1169.29,1708.66 655.12,2079.53 2291.34,2917.32 2409.45,2917.32 2330.71,3192.91
  other v2: 1625.98,2693.9 1582.68,3405.51
  other v3: 3011.81,2122.05 2866.14,2149.61 3011.81,2149.61 2866.14,2177.16 3011.81,2177.17
5V0: C113.1 C114.1 C119.1 HDR_B1.97 HDR_B1.99 HDR_T1.97 HDR_T1.99 R19.1 TP4.1 U6.2 U6.4 U7.2 U7.7 | length 4287.4
  Top Layer w12: C119.1@1661.42,2543.31 1684.06,2520.66 U7.2@1736.22,2520.67 U7.7@1917.32,2520.67 1953.34,2520.66 1962.2,2529.53 1962.2,2556.3 1948.5,2570 1859.53,2570 1846.85,2582.68 ; v2(1808.5,2704.6) 1798.1,2715 1765,2715 1760,2710 1760,2669.13 1859.13,2570
  Top Layer w15.75: v3(2460.63,1602.36) 2490.62,1602.36 R19.1@2492.12,1600.86 ; U6.2@2824.58,1658.25 2889.67,1658.25 2889.67,1708.25 U6.4@2824.58,1708.25 ; C113.1@2988.18,1464.56 v3(2988.19,1507.87)
  Top Layer w20: v3(2769.67,1516.41) C114.1@2807.08,1516.41 ; v3(2769.67,1543.97) C114.1@2807.08,1543.97 ; v3(2769.67,1461.29) C114.1@2807.08,1461.29 ; v3(2769.67,1488.85) C114.1@2807.08,1488.85 ; C114.1@2809.04,1461.29 C114.1@2807.08,1461.29 ; C114.1@2809.04,1488.85 C114.1@2807.08,1488.85 ; C114.1@2809.04,1516.41 C114.1@2807.08,1516.41 ; C114.1@2809.04,1543.97 C114.1@2807.08,1543.97 ; 2853.65,1461.29 C114.1@2807.08,1461.29 ; 2857.47,1516.41 C114.1@2807.08,1516.41 ; 2860.42,1543.97 C114.1@2807.08,1543.97 ; 2862.51,1488.85 C114.1@2807.08,1488.85 ; C113.1@2998.04,1461.1 v3(3037.41,1461.1) ; 2998.04,1488.66 v3(3037.41,1488.66) ; v3@2998.04,1516.22 v3(3037.41,1516.22) ; 2998.04,1543.78 v3(3037.41,1543.78)
  Top Layer w43.31: v1@2645.67,2259.84 v1(2645.67,2283.47) 2645.67,2401.58 2736.22,2401.58 2736.22,2346.46 2736.22,2314.96 2736.22,2283.47 2736.22,2259.84 2708.66,2259.84 2677.17,2259.84 v1@2645.67,2259.84
  MidLayer4 w30: 2484.5,2736.3 2508.2,2760 2685,2760 2763.67,2838.67 TP4.1@2875.71,2838.67
  MidLayer4 w43.31: v2@1813.28,2713.28 1832.4,2732.4 2146.5,2732.4 2169.6,2755.5 2465.3,2755.5 2484.5,2736.3 2484.5,2519.44 2657.48,2346.46 v3(2708.66,2346.46)
  Bottom Layer w43.31: 2649.61,263.78 v3@2677.17,263.78 ; v3@2716.54,255.91 2718.5,255.91 2708.66,255.91 2677.17,255.9 2645.67,255.9 v1(2645.67,283.46) 2645.67,338.58 2645.67,354.33 2665.36,354.33 2708.66,354.33 2736.22,354.33 2736.22,346.46 v3@2736.22,314.96 ; v1@2645.67,2259.84 v1(2645.67,2283.47) 2645.67,2338.58 2645.67,2354.33 2665.36,2354.33 2708.66,2354.33 2736.22,2354.33 2736.22,2346.46 2736.22,2314.96 2736.22,2283.47 2736.22,2259.84 2708.66,2259.84 2677.17,2259.84 v1@2645.67,2259.84
  other v1: 2645.67,251.97 2645.67,2251.97
  other v3: 2677.17,251.97 2708.66,251.97 2677.17,283.46 2708.66,283.46 2708.66,314.96 2740.16,314.96 2708.66,346.46 2740.16,346.46 2677.17,2251.97 2708.66,2251.97 2740.16,2251.97 2677.17,2283.47 2708.66,2283.47 2740.16,2283.47 2708.66,2314.96 2740.16,2314.96 2740.16,2346.46
AGND: C111.2 C117.1 NT8.1 R22.2 R23.2 U6.9 U6.11 | length 449.7
  Top Layer w7.87: v3(2397.64,1726.28) 2397.64,1696.85 2401.58,1692.91 C111.2@2425.19,1692.91
  Top Layer w13.78: C117.1@2391.73,1783.46 v3(2452.75,1783.46) ; R23.2@3013.3,1814.96 v3(3047.24,1814.96) ; R22.2@3013.3,1866.14 v3(3047.24,1866.14)
  Top Layer w15.75: U6.9@2589.19,1808.68 2591.08,1808.69 2592.58,1808.69 2661.35,1808.87 2661.35,1808.76 ; U6.11@2591.08,1758.25 U6.11@2592.58,1758.25 2653.67,1758.25 v3(2657.19,1761.76) ; 2657.48,1808.76 2661.35,1808.76 ; v3@2661.35,1758.26 2661.35,1761.76 2661.35,1808.76
  Top Layer w19.68: v3(2397.64,1726.28) 2397.64,1777.55 C117.1@2391.73,1783.46 C117.1@2397.64,1789.37
  other v3: 2519.68,1917.32
BUS_A1: U3.E2 U4.B20 | length 1958.4
  Top Layer w5: U4.B20@1779.53,1925.2 v1(1799.21,1944.88)
  Top Layer w7.87: U3.E2@2350.39,3134.84 v1(2370.08,3153.55)
  MidLayer2 w5: v1(1799.21,1944.88) 1799.21,1956.76 1779.53,1976.45 1779.53,1994.88 1779.53,2018 1897.25,2135.72 1897.25,2178.54 1939.96,2221.26 1985,2221.26 2010,2246.26 2010,2258 2043.31,2291.31 2043.31,2665.35 2051.18,2673.23 2051.18,2688.98 2232.28,2870.08 2232.28,3086.61 2279.53,3133.86 2350.39,3133.86 v1(2370.08,3153.55)
  Bottom Layer w5: v1(2043.31,3149.61) 2098.43,3094.49 2224.41,3094.49 2241.96,3112.04 ; 2242,3112 2263.86,3133.86 2350.39,3133.86 v1(2370.08,3153.55)
BUS_A2: U3.D2 U4.M19 U8.23 U9.23 U12.1 U13.1 | length 5384.2
  Top Layer w5: U4.M19@1740.16,1531.5 v1(1759.84,1551.18) ; U8.23@2023.62,3452.76 v2(2023.62,3503.93) ; U12.1@2271.65,3452.76 v1(2271.65,3500) ; U3.D2@2389.76,3134.84 2390.75,3134.85 v1(2409.45,3153.54)
  MidLayer1 w5: v2(2023.62,3503.93) 2023.62,3523.62 2047.24,3547.24 2224.41,3547.24 v1(2271.65,3500)
  MidLayer2 w5: v1(1759.84,1551.18) 1779.52,1570.86 2010.71,1570.86 2265.17,1825.32 2265.17,2013.26 2496.06,2244.16 2496.06,2263.78 2480.31,2279.53 2480.31,2303.15 2468.5,2314.96 2468.5,2822.83 2547.24,2901.57 2547.24,3086.61 2500,3133.86 2429.13,3133.86 v1(2409.45,3153.54) 2440.94,3185.04 2830.71,3185.04 2850.39,3204.72 2929.72,3204.72 3000,3275 v1(3000,3377.95)
  MidLayer4 w5: v2(1456.69,3381.89) 1456.69,3500 1437.01,3519.68 1437.01,3535.43 1496.06,3594.49 1952.75,3594.49 2023.62,3523.63 v2(2023.62,3503.93) ; v1(2271.65,3500) 2271.65,3519.69 2401.57,3649.61 2937.39,3649.61 3000,3587 v1(3000,3377.95)
  Bottom Layer w5: v2(1456.69,3381.89) U9.23@1456.69,3452.76 ; v1(3000,3377.95) U13.1@3000,3452.76
BUS_A3: U3.C2 U4.M22 U8.24 U9.24 U12.2 U13.2 | length 5328.5
  Top Layer w5: U4.M22@1858.27,1531.5 v1(1877.95,1551.18) ; U8.24@2055.12,3452.76 v2(2055.11,3527.55) ; U12.2@2303.15,3452.76 v1(2303.15,3523.62) ; U3.C2@2429.13,3134.84 2430.12,3134.85 v1(2448.82,3153.54)
  MidLayer1 w5: v2(2055.11,3527.55) 2055.12,3507.87 2094.49,3468.5 2283.46,3468.5 2303.15,3488.19 v1(2303.15,3523.62)
  MidLayer2 w5: v1(1877.95,1551.18) 1897.64,1531.49 2007.49,1531.49 2077.95,1601.95 2077.95,1622.36 2279.93,1824.34 2279.93,2010.31 2507.23,2237.62 2507.23,2250.41 2527.98,2271.16 2527.98,2286.98 2480.31,2334.65 2480.31,2755.91 ; 2480.31,2744.09 2480.31,2818.9 2557.48,2896.06 2557.48,3096.06 2500,3153.54 v1(2448.82,3153.54) 2448.82,3169.29 2452.76,3173.23 2838.58,3173.23 2854.33,3188.98 2931.85,3188.98 2953.81,3210.94 2960.94,3210.94 2997.73,3247.73 2997.73,3254.85 3019.68,3276.81 3019.68,3385.83 3003.94,3401.57 v1(2968.5,3401.57)
  MidLayer4 w5: v2(1425.2,3405.51) 1425.2,3472.44 1405.51,3492.13 1405.51,3511.81 1417.32,3523.62 1417.32,3535.43 1488.19,3606.3 1976.37,3606.3 v2(2055.11,3527.55) ; v1(2303.15,3523.62) 2307.09,3523.62 2421.26,3637.8 2932.21,3637.79 2987,3583 2987,3420.07 v1(2968.5,3401.57)
  Bottom Layer w5: v2(1425.2,3405.51) U9.24@1425.2,3452.76 ; v1(2968.5,3401.57) U13.2@2968.5,3452.76
BUS_A4: U3.A2 U4.P26 U8.25 U9.25 U12.3 U13.3 | length 4894.5
  Top Layer w5: U4.P26@2015.75,1452.76 2032.65,1452.76 2071.62,1491.73 2176.11,1491.73 2322.83,1638.46 2322.83,2050.27 2509.2,2236.63 2509.2,2253.29 2527.56,2271.65 2527.56,2302.56 2502.31,2327.81 2502.31,2762.15 2557.76,2817.6 2639.37,2899.21 2639.37,3075.2 2562.01,3152.55 2525.58,3152.55 U3.A2@2507.87,3134.84 ; U8.25@2086.61,3452.76 v2(2086.61,3503.93) ; U12.3@2334.64,3452.76 v1(2334.64,3500)
  MidLayer1 w5: v1(2550.19,3152.55) 2699.8,3152.55 2879.76,3332.52 2899.45,3332.52 v1(2937.01,3370.08)
  MidLayer4 w5: v2(1393.7,3527.56) 1484.25,3618.11 1992.62,3618.11 2086.61,3524.12 v2(2086.61,3503.93) 2110.23,3480.32 2314.96,3480.32 v1(2334.64,3500) 2334.64,3535.43 2425.19,3625.98 2923.02,3625.98 2976,3573 2976,3441 2937.01,3402.01 v1(2937.01,3370.08)
  Bottom Layer w5: U9.25@1393.7,3452.76 v2(1393.7,3527.56) ; U13.3@2933.07,3452.76 U13.3@2933.07,3430.12 ; v1(2937.01,3370.08) 2937.01,3413.39 2933.07,3417.32 U13.3@2933.07,3430.12 ; U13.3@2937.01,3434.05 U13.3@2933.07,3430.12
BUS_A5: U3.B2 U4.N20 U8.26 U9.26 U12.4 U13.4 | length 5297.6
  Top Layer w5: U4.N20@1779.53,1492.13 1800.06,1471.59 2029.49,1471.59 2059.84,1501.94 2167.01,1501.94 2311.02,1645.95 2311.02,2062.93 2496.06,2247.97 2496.06,2263.78 2488.19,2271.65 2488.19,2763.78 2626.77,2902.36 2626.77,3059.05 2571.65,3114.17 v1(2488.19,3114.17) 2468.51,3133.86 U3.B2@2468.5,3134.84 ; U8.26@2118.11,3452.76 v2(2118.11,3527.55) ; U12.4@2366.14,3452.76 v1(2366.14,3523.62)
  MidLayer1 w5: v2(2118.11,3527.55) 2165.34,3480.32 2279.53,3480.32 2291.34,3492.13 2291.34,3507.87 2281.65,3517.56 2281.65,3529.68 2299.21,3547.24 2342.52,3547.24 v1(2366.14,3523.62) ; v1(2488.19,3114.17) 2488.19,3133.86 2527.56,3173.23 2703.74,3173.23 2873.03,3342.52 2888.27,3342.52 2913.39,3367.64 v1(2913.39,3401.57)
  MidLayer4 w5: v2(1362.2,3405.51) 1362.2,3472.44 1342.52,3492.13 1342.52,3511.81 1460.63,3629.92 2015.74,3629.92 v2(2118.11,3527.55) ; v1(2366.14,3523.62) 2366.14,3535.43 2433.07,3602.36 2893.7,3602.36 2924.7,3571.36 2924.7,3524.11 2933.07,3515.75 2933.07,3421.26 v1(2913.39,3401.57)
  Bottom Layer w5: v2(1362.2,3405.51) U9.26@1362.21,3452.76 ; U13.4@2905.51,3448.82 U13.4@2901.57,3452.76 2901.57,3413.39 v1(2913.39,3401.57)
BUS_A6: U3.D3 U4.D21 U8.29 U9.29 U12.5 U13.5 | length 4680.2
  Top Layer w5: U4.D21@1818.9,1846.46 v1(1838.58,1866.14) ; v2(2118.1,3850.39) U8.29@2118.11,3901.57 ; U12.5@2397.64,3452.76 v1(2397.64,3500)
  Top Layer w7.87: U3.D3@2389.77,3095.48 v1(2409.45,3114.18)
  MidLayer1 w5: v1(2409.45,3114.18) 2425.2,3114.18 2429.13,3118.11 2429.13,3122.05 2440.94,3133.86 2472.44,3133.86 2523.62,3185.04 2700.79,3185.04 v1(2881.89,3366.14)
  MidLayer2 w5: v1(1838.58,1866.14) 1858.27,1885.83 1858.27,1916.93 1866.54,1925.2 1885.83,1925.2 1897.64,1937.01 1897.64,2030.64 1954,2087 2030.06,2087 2103.79,2160.74 2103.79,2230.19 2118.11,2244.5 2118.11,2263.78 2106.3,2275.59 2106.3,2291.34 2122.05,2307.09 2122.05,2645.67 2110.24,2657.48 2110.24,2673.23 2311.02,2874.02 2311.02,3082.68 2322.83,3094.49 2350.39,3094.49 2370.08,3114.18 v1(2409.45,3114.18)
  MidLayer3 w5: v2(2118.1,3850.39) 2118.11,3822.84 2397.64,3543.31 v1(2397.64,3500)
  MidLayer4 w5: v2(1362.2,3948.82) 1362.2,3885.83 1342.52,3866.14 1342.52,3842.52 1460.63,3724.41 2011.81,3724.41 2118.1,3830.7 v2(2118.1,3850.39) ; v1(2397.64,3500) 2397.64,3535.93 2440.45,3578.74 2854.33,3578.74 2866.14,3566.93 2866.14,3555.86 2889.76,3532.24 2889.76,3515.75 2881.89,3507.87 v1(2881.89,3366.14)
  Bottom Layer w5: U9.29@1362.2,3901.59 v2(1362.2,3948.82) ; U13.5@2870.08,3452.76 2870.08,3433.07 2881.89,3421.26 v1(2881.89,3366.14)
BUS_A7: U3.C3 U4.L17 U8.30 U9.30 U12.18 U13.18 | length 5065.4
  Top Layer w5: U4.L17@1661.42,1570.87 v1(1681.1,1590.55) ; v2(2086.61,3826.77) U8.30@2086.61,3901.57 ; U12.18@2807.09,3452.76 2807.09,3496.06 2826.77,3515.75 2826.77,3527.56 v1(2846.46,3555.12)
  Top Layer w7.87: U3.C3@2429.14,3095.48 v1(2448.82,3114.17)
  MidLayer2 w5: v1(1681.1,1590.55) 1700.79,1610.24 1932.68,1610.24 1935.43,1607.48 1972.44,1607.48 1975.2,1610.24 2026.47,1610.24 2250.49,1834.26 2250.49,2015.32 2456.69,2221.52 2456.69,2263.78 2468.5,2275.59 2468.5,2295.28 2456.69,2307.09 2456.69,2826.77 2507.87,2877.95 2507.87,3082.68 2496.06,3094.49 2468.5,3094.49 v1(2448.82,3114.17) ; v1(2688.98,3295.28) 2795.28,3401.57 2795.28,3484.25 2826.77,3515.75 2826.77,3535.43 v1(2846.46,3555.12)
  MidLayer3 w5: v2(2086.61,3826.77) 2086.61,3858.26 2098.43,3870.08 2125.98,3870.08 2137.8,3858.27 2137.8,3826.77 2409.45,3555.12 2409.45,3515.75 2460.63,3464.57 v2(2460.63,3401.57)
  MidLayer4 w5: v2(1393.7,3826.77) 1484.25,3736.22 1996.06,3736.22 v2(2086.61,3826.77) ; v2(2460.63,3401.57) 2519.68,3460.63 2771.65,3460.63 2826.77,3515.75 2826.77,3535.43 v1(2846.46,3555.12)
  Bottom Layer w5: v2(1393.7,3826.77) U9.30@1393.7,3901.57 ; v1(2448.82,3114.17) 2559.06,3224.41 2606.3,3224.41 2610.24,3228.35 2629.92,3248.03 2629.92,3263.78 2641.73,3275.59 2657.48,3275.59 2669.29,3287.4 2669.29,3291.34 2673.23,3295.28 v1(2688.98,3295.28) ; v2(2460.63,3401.57) U13.18@2460.63,3452.76 U13.18@2460.63,3472.44
BUS_A8: U3.A3 U4.M25 U8.31 U9.31 U12.19 U13.19 | length 4959.5
  Top Layer w5: U4.M25@1976.38,1531.5 1995.7,1512.17 2159.12,1512.17 2299.21,1652.26 2299.21,2082.73 2456.69,2240.21 2456.69,2263.78 2464.57,2271.65 2464.57,2755.91 2613.78,2905.12 2613.78,3039.76 2578.74,3074.8 v1(2527.56,3074.8) ; v2(2055.11,3850.39) U8.31@2055.12,3901.57 ; U12.19@2838.58,3452.76 2838.58,3472.44 2858.27,3492.13 2858.27,3511.81 v1(2870.08,3523.62)
  Top Layer w7.87: U3.A3@2507.88,3095.48 v1(2527.56,3074.8)
  MidLayer2 w5: v1(2688.98,3240.16) 2708.66,3240.16 2826.77,3358.27 2826.77,3366.14 2826.77,3437.01 2870.08,3480.31 v1(2870.08,3523.62)
  MidLayer3 w5: v2(2055.11,3850.39) 2055.11,3818.9 2080.55,3793.46 2123.86,3793.46 2370.08,3547.24 2385.83,3531.5 2385.83,3515.28 2385.36,3515.28 2377.95,3507.87 2377.95,3480.32 2429.13,3429.13 v1(2429.13,3377.95)
  MidLayer4 w5: v2(1425.2,3948.82) 1425.2,3885.83 1421.26,3881.89 1405.51,3866.14 1405.51,3842.52 1417.32,3830.71 1417.32,3822.83 1492.13,3748.03 1976.38,3748.03 2055.11,3826.77 v2(2055.11,3850.39) ; v1(2429.13,3377.95) 2448.82,3358.27 2511.81,3358.27 2594.49,3440.94 2811.02,3440.94 2858.27,3488.19 2858.27,3511.81 v1(2870.08,3523.62)
  Bottom Layer w5: U9.31@1425.2,3901.57 v2(1425.2,3948.82) ; v1(2429.13,3377.95) U13.19@2429.13,3452.76 ; v1(2527.56,3074.8) 2527.56,3094.49 2673.23,3240.16 v1(2688.98,3240.16)
BUS_A9: U3.B6 U4.M26 U8.32 U9.32 U12.20 U13.20 | length 5007.8
  Top Layer w5: U4.M26@2017.72,1531.5 U4.M26@2015.75,1531.5 2036.22,1531.5 v1(2097.64,1592.91) ; v2(2023.62,3826.77) U8.32@2023.62,3901.57 ; U12.20@2870.08,3452.76 2870.08,3496.06 2901.57,3527.56 v1(2901.57,3562.99)
  Top Layer w7.87: U3.B6@2468.5,2977.36 v1@2488.19,2957.68
  MidLayer1 w5: v1(2097.64,1592.91) 2097.64,1646.97 2309.63,1858.96 2309.63,2076.42 2454.1,2220.89 2454.1,2261.18 2468.5,2275.59 2468.5,2323.85 2487.55,2342.9 2487.55,2869.42 2507.88,2889.75 ; v1@2488.68,2957.19 2507.87,2938 ; 2507.88,2890.01 2507.87,2937.01
  MidLayer3 w5: v2(2023.62,3826.77) 2066.93,3783.46 2102.36,3783.46 2122.05,3763.78 2346.46,3539.37 2346.46,3515.75 2366.14,3496.06 2366.14,3433.07 v2(2397.64,3401.57) ; v1(2822.83,3220.47) 2822.7,3238.32 2814.96,3246.06 2814.96,3277.56 2831.69,3294.29 2831.69,3343.5 2881.89,3393.7 2881.89,3507.87 2901.57,3527.56 ; 2901.57,3527.56 v1(2901.57,3562.99)
  MidLayer4 w5: v2(1456.69,3948.82) 1456.69,3854.33 1437.01,3834.65 1437.01,3818.9 1496.06,3759.84 1956.69,3759.84 v2(2023.62,3826.77) ; v2(2397.64,3401.57) 2397.64,3358.27 2429.13,3326.77 2877.95,3326.77 2905.51,3354.33 2905.51,3377.95 2893.7,3389.76 2893.7,3464.57 2921.26,3492.13 2921.26,3507.87 2913.39,3515.75 2913.39,3551.18 v1(2901.57,3562.99)
  Bottom Layer w5: U9.32@1456.69,3901.57 v2(1456.69,3948.82) ; v2(2397.64,3401.57) U13.20@2397.64,3452.76 ; v1(2488.19,2956.69) 2488.19,2992.98 2715.68,3220.47 v1(2822.83,3220.47)
BUS_A10: U3.A6 U4.M18 U8.33 U9.33 U12.21 U13.21 | length 5321.7
  Top Layer w5: U4.M18@1700.79,1531.5 v1(1720.47,1551.18) ; v2(1992.12,3850.39) U8.33@1992.13,3901.57 ; U3.A6@2507.87,2977.36 2507.87,2977.16 2563.39,2977.16 v1(2584.25,2956.3) ; U12.21@2901.57,3452.76 v1(2901.57,3500)
  MidLayer2 w5: v1(2537.8,2142.91) 2537.8,2157.09 2559.05,2178.35 2559.05,2271.65 2490.5,2340.2 2490.5,2807.43 2584.25,2901.18 v1(2584.25,2956.3) ; v1(2835.63,3259.84) 2835.63,3284.45 2901.57,3350.39 2901.57,3381.89 2893.7,3389.76 2893.7,3468.5 2901.57,3476.38 v1(2901.57,3500)
  MidLayer3 w5: v2(1992.12,3850.39) 1992.12,3811.03 2031.5,3771.65 2098.43,3771.65 2322.83,3547.24 2322.83,3515.75 2314.96,3507.87 2314.96,3448.82 2366.14,3397.64 v1(2366.14,3377.95)
  MidLayer4 w5: v2(1488.19,3850.39) 1488.19,3814.96 1531.5,3771.65 1937.01,3771.65 1992.12,3826.77 v2(1992.12,3850.39) ; v1@1721,1551.18 1740.69,1570.88 1925.18,1570.88 1974.7,1521.36 2012.7,1521.36 2054.53,1563.19 2188.39,1563.19 2320.97,1695.78 2398.67,1695.78 2425.86,1722.96 2425.86,2020.35 2537.8,2132.29 v1(2537.8,2142.91) ; v1(2366.14,3377.95) 2366.14,3496.06 2385.36,3515.28 2385.83,3515.28 2385.83,3540.11 2436.27,3590.55 2862.2,3590.55 2877.95,3574.8 2877.95,3559.06 2901.57,3535.43 v1(2901.57,3500)
  Bottom Layer w5: v2(1488.19,3850.39) U9.33@1488.19,3901.57 ; v1(2366.14,3377.95) U13.21@2366.14,3452.76 ; v1(2584.25,2956.3) 2606.3,2978.35 2606.3,3096.85 2710.23,3200.79 2831.69,3200.79 2842.52,3211.61 2842.52,3232.29 2835.63,3239.17 v1(2835.63,3259.84) v1@2836.54,3258.79
BUS_A11: U3.C6 U4.M21 U8.34 U9.34 U12.22 U13.22 | length 5112.7
  Top Layer w5: U4.M21@1818.9,1531.5 v1(1838.58,1551.18) ; v2(1960.62,3826.77) U8.34@1960.63,3901.57 ; U12.22@2933.07,3452.76 2933.07,3519.68 v1(2944.88,3531.5)
  Top Layer w7.87: U3.C6@2429.13,2977.36 v1@2448.82,2957.68
  MidLayer1 w5: v1(1838.58,1551.18) 1858.27,1570.87 1997.26,1570.87 ; 1997.64,1570.87 2003.94,1570.87 2012.22,1579.15 2299.5,1866.43 2299.5,2086.95 2433.07,2220.53 2433.07,2263.78 2421.26,2275.59 2421.26,2299.21 2468.51,2346.46 2468.51,2937.99 v1@2448.82,2957.68
  MidLayer2 w5: v1(2944.88,3531.5) 2944.88,3393.7 2956.69,3381.89 2956.69,3358.27 2952.76,3354.33 2937.01,3338.58 2937.01,3297.24 v1(2964.57,3269.68)
  MidLayer3 w5: v2(1960.62,3826.77) 2027.56,3759.84 2094.49,3759.84 2279.53,3574.8 2279.53,3519.68 2291.34,3507.87 2291.34,3444.88 v2(2334.65,3401.57)
  MidLayer4 w5: v2(1519.68,3948.82) 1519.68,3854.33 1500,3834.65 1500,3818.9 1535.43,3783.46 1917.32,3783.46 v2(1960.62,3826.77) ; v2(2334.65,3401.57) 2334.65,3472.44 2354.33,3492.13 2354.33,3507.87 2346.46,3515.75 2346.46,3531.5 2429.13,3614.17 2897.64,3614.17 2944.88,3566.93 v1(2944.88,3531.5) ; v1(2448.82,2956.69) 2468.5,2976.38 2649.61,2976.38 2858.27,3185.04 2909.45,3185.04 2964.57,3240.16 2964.57,3266.73 v1@2961.61,3269.68
  Bottom Layer w5: U9.34@1519.69,3901.57 v2(1519.68,3948.82) ; v2(2334.65,3401.57) U13.22@2334.65,3452.76
BUS_A12: U3.D6 U4.K25 U8.22 U9.22 U12.23 U13.23 | length 5361
  Top Layer w5: U4.K25@1976.38,1610.24 v1(1996.06,1629.92) ; U8.22@1992.13,3452.76 v2(1992.12,3527.55) ; v2(2933.07,3850.39) U12.23@2933.07,3901.57
  Top Layer w7.87: U3.D6@2389.76,2977.36 v1@2409.45,2957.68
  MidLayer1 w5: v1@1996.46,1630.32 v1(1996.06,1629.92) 2043.2,1629.92 2289.21,1875.93 2289.21,2095.37 2393.7,2199.85 2393.7,2263.78 2405.51,2275.59 2405.51,2303.15 2417.32,2314.96 2417.32,2665.35 2433.07,2681.1 2433.07,2696.85 2393.7,2736.22 2393.7,2874.02 2429.14,2909.46 2429.14,2937 v1(2409.45,2956.69) 2409.45,2957.68 v1@2409.94,2957.19
  MidLayer2 w5: v2(1992.12,3527.55) 2023.62,3559.06 2141.73,3559.06 2314.96,3732.28 2314.96,3834.64 2326.77,3846.46 v2(2326.77,3952.76) ; v2(2933.07,3850.39) 2933.07,3610.24 3043.31,3500 3043.31,3240.16 v1(2988.19,3185.04)
  MidLayer4 w5: v2(1488.19,3503.94) 1488.19,3539.37 1531.5,3582.68 1937,3582.68 v2(1992.12,3527.55) ; v2(2326.77,3952.76) 2326.77,3933.07 2334.65,3925.2 2334.65,3854.33 2354.33,3834.65 2354.33,3811.02 2370.08,3795.28 2913.39,3795.28 2933.07,3814.96 v2(2933.07,3850.39) ; v1(2409.45,2956.69) 2429.13,2937.01 2547.24,2937.01 2563.39,2920.87 2714.96,2920.87 2800,3005.91 2800,3060 2830,3090 2950,3090 2988.19,3128.19 v1(2988.19,3185.04)
  Bottom Layer w5: U9.22@1488.19,3452.76 v2(1488.19,3503.94) ; v2(2326.77,3952.76) 2326.77,3929.13 2334.65,3921.26 U13.23@2334.65,3901.57
BUS_A13: U3.B7 U4.L18 U8.35 U9.35 U12.24 U13.24 | length 5426.1
  Top Layer w5: U4.L18@1700.79,1570.87 v1(1720.47,1590.55) ; v2(1929.13,3850.39) U8.35@1929.13,3901.57 ; v1(2104.72,1903.54) 2125.98,1882.28 2239.48,1882.28 2272.06,1914.86 2272.06,2182.06 2311.81,2221.81 2311.81,2259.06 2299.31,2271.56 2299.31,2293.7 2433.07,2427.46 2433.07,2756.79 ; 2433.07,2740.16 2433.07,2807.09 2488.19,2862.21 v1(2488.19,2917.32) 2488.19,2918.31 U3.B7@2468.5,2937.99 ; v2(2901.57,3826.77) U12.24@2901.57,3901.57
  MidLayer1 w5: v2(1929.13,3850.39) 1929.13,3913.39 2011.81,3996.06 2322.83,3996.06 v2(2366.14,3952.76)
  MidLayer2 w5: v2(2901.57,3826.77) 2913.39,3814.96 2913.39,3606.3 3031.5,3488.19 3031.5,3259.84 v1(2956.69,3185.04)
  MidLayer4 w5: v2(1551.18,3948.82) 1551.18,3881.89 1531.5,3862.2 1531.5,3842.52 1578.74,3795.28 1897.64,3795.28 1929.13,3826.77 v2(1929.13,3850.39) ; v1(1720.47,1590.55) 1720.47,1591.1 1700.5,1611.07 1700.5,1637.51 1751.67,1688.68 1846.06,1688.68 1857.89,1700.51 1857.89,1716.95 1859.81,1718.87 ; 1859.71,1718.77 1869.67,1728.72 1927.95,1728.72 1936.63,1737.4 1936.63,1796.87 1947.23,1807.46 1966.54,1807.46 1976,1816.93 1976,1839.22 1983.46,1846.68 2047.86,1846.68 v1(2104.72,1903.54) ; v2(2366.14,3952.76) 2421.26,4007.87 2834.65,4007.87 2858.27,3984.25 2858.27,3968.5 2850.39,3960.63 2850.39,3905.51 2889.76,3866.14 2889.76,3838.58 v2(2901.57,3826.77)
  Bottom Layer w5: U9.35@1551.18,3881.89 U9.35@1551.18,3901.57 v2(1551.18,3948.82) ; U13.24@2366.14,3901.57 v2(2366.14,3952.76) ; v1(2488.19,2917.32) 2507.87,2897.64 2579.13,2897.64 2730.5,3049 2829,3049 2870,3090 2930,3090 2956.69,3116.69 v1(2956.69,3185.04)
BUS_A14: U3.A7 U4.K26 U8.36 U9.36 U12.25 U13.25 | length 4890.6
  Top Layer w5: v2(1897.63,3826.77) U8.36@1897.64,3901.57 ; U4.K26@2015.75,1610.24 2028.74,1623.23 2228.35,1623.23 2288.98,1683.86 2288.98,2090.21 2440.55,2241.78 2440.55,2256.3 2425.2,2271.65 2425.2,2292.12 2453.54,2320.47 2453.54,2762.99 2527.56,2837.01 v1(2527.56,2917.32) ; v2(2870.08,3850.39) U12.25@2870.08,3901.57
  Top Layer w7.87: U3.A7@2507.87,2937.99 v1@2527.56,2918.31
  MidLayer1 w5: v2(1897.63,3826.77) 1897.64,3921.26 1917.32,3940.94 1917.32,3956.69 1909.45,3964.57 1909.45,3980.32 1921.26,3992.13 1988.19,3992.13 2003.94,4007.87 2342.52,4007.87 v2(2397.64,3952.76)
  MidLayer3 w5: v2(2870.08,3850.39) 2881.89,3838.58 2881.89,3814.96 2921.26,3775.59 2921.26,3555.12 2913.39,3547.24 2913.39,3515.75 2921.26,3507.87 2921.26,3444.88 2893.7,3417.32 2893.7,3389.76 2901.57,3381.89 2901.57,3354.33 2897,3349.76 2897,3300.06 2934.06,3263 v1(2934.06,3166.34)
  MidLayer4 w5: v2(1582.68,3830.71) 1606.3,3807.09 1877.95,3807.09 v2(1897.63,3826.77) ; v2(2397.64,3952.76) 2440.94,3996.06 2791.34,3996.06 2838.58,3948.82 2838.58,3881.89 v2(2870.08,3850.39)
  Bottom Layer w5: v2(1582.68,3830.71) U9.36@1582.68,3901.57 ; U13.25@2397.64,3901.57 v2(2397.64,3952.76) ; v1(2527.56,2917.32) 2583.86,2917.32 2616.5,2949.97 2616.5,3092.88 2712.6,3188.98 2911.42,3188.98 v1(2934.06,3166.34)
BUS_A15: U3.C7 U4.J21 U8.20 U9.20 U12.26 U13.26 | length 4938.6
  Top Layer w5: U4.J21@1818.9,1649.61 v1(1838.58,1669.29) ; U8.20@1929.13,3452.76 v2(1929.13,3527.55) ; v1(2230.73,1907.98) 2210.06,1928.64 2210.06,1952.26 2239.58,1981.78 2239.58,2233.58 2241,2235 ; 2241.15,2234.85 2250,2243.7 2250,2257.87 2236.42,2271.46 2236.42,2290.94 2358.27,2412.8 2358.27,2669.29 2370.08,2681.1 2370.08,2795.28 2448.82,2874.02 v1(2448.82,2917.32) ; U3.C7@2429.13,2937.99 v1@2448.82,2918.31 ; v2(2838.58,3826.77) U12.26@2838.58,3901.57
  MidLayer2 w5: v2(1929.13,3527.55) 1972.44,3570.87 2129.92,3570.87 2291.34,3732.28 2291.34,3834.65 2283.46,3842.52 2283.46,3859.06 2307.09,3882.68 2307.09,3960.63 2318.9,3972.44 2409.45,3972.44 v2(2429.13,3952.76) ; v1(2681.1,3267.72) 2696.85,3267.72 2811.02,3381.89 2811.02,3440.94 2858.27,3488.19 2858.27,3507.87 2850.39,3515.75 2850.39,3531.5 2866.14,3547.25 2866.14,3574.8 2846.46,3594.49 2846.46,3673.23 2834.64,3685.04 2834.64,3704.72 2838.58,3708.66 v2(2838.58,3826.77)
  MidLayer3 w5: v1(2448.82,2917.32) 2468.5,2937.01 2516.14,2937.01 2527.95,2948.82 2527.95,3032.68 2653.97,3158.69 ; 2654.12,3158.85 2668.91,3173.64 2668.91,3255.53 v1(2681.1,3267.72)
  MidLayer4 w5: v2(1551.18,3405.51) 1551.18,3476.38 1531.5,3496.06 1531.5,3511.81 1543.31,3523.62 1543.31,3535.43 1566.93,3559.06 1897.63,3559.06 v2(1929.13,3527.55) ; v1(1838.58,1669.29) 1850.39,1669.29 1869.7,1688.6 1947.13,1688.6 1986.61,1728.08 2091.47,1728.08 2206.27,1842.89 ; 2206.13,1843.03 2230.73,1867.63 v1(2230.73,1907.98) v1@2230.73,1908.96 ; v2(2429.13,3952.76) 2429.13,3929.13 2472.44,3885.83 2744.09,3885.83 2803.15,3826.77 v2(2838.58,3826.77)
  Bottom Layer w5: v2(1551.18,3405.51) U9.20@1551.18,3452.76 ; U13.26@2429.13,3901.57 v2(2429.13,3952.76)